# Altium PCB LED_Board.PcbDoc
Units mm, origin at the board's own origin, x right, y up, seen from the top; angles counter-clockwise.
Board outline 90 x 70 mm, 2 copper layers (Top Layer, Bottom Layer), stack 1.448 mm thick; 29 components, 16 nets, 91 pads, 36 vias.
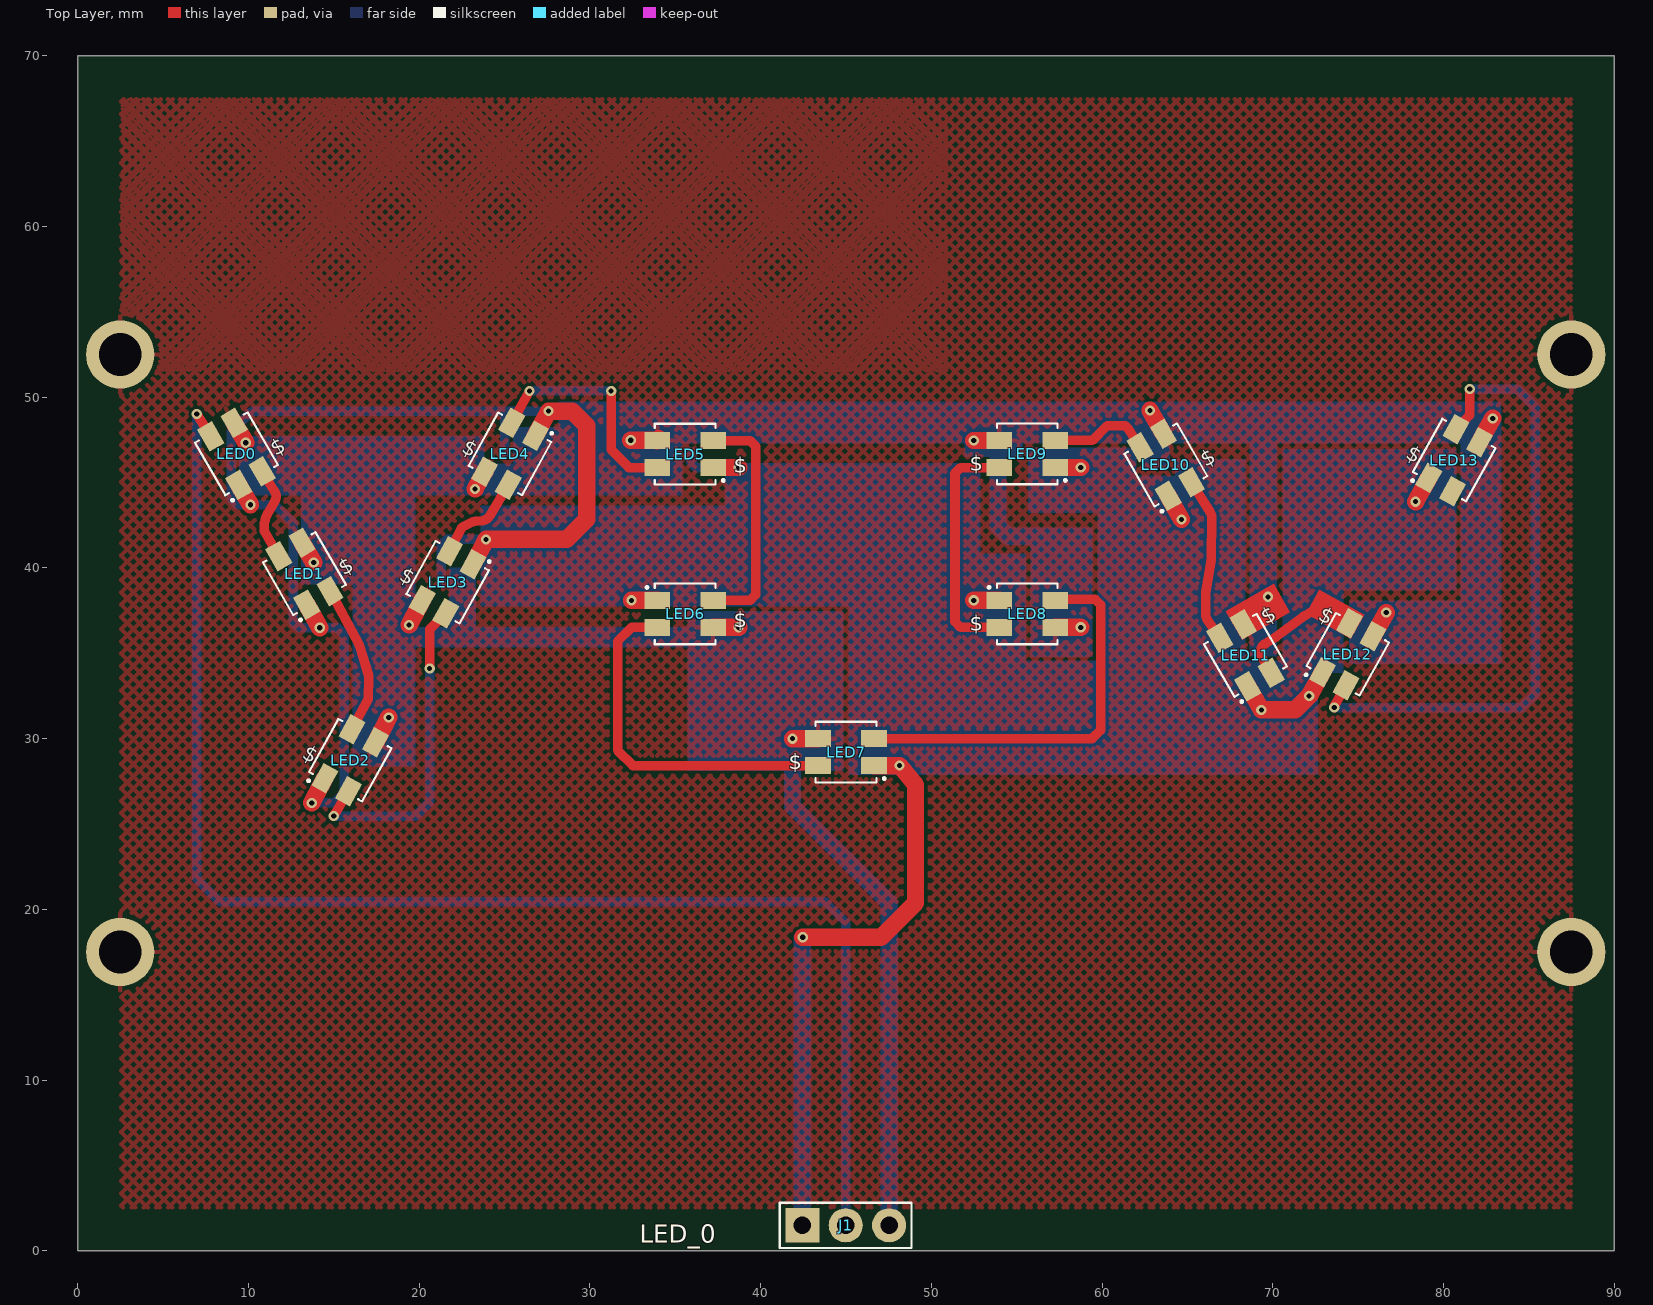
[diagram p0: Top Layer view]
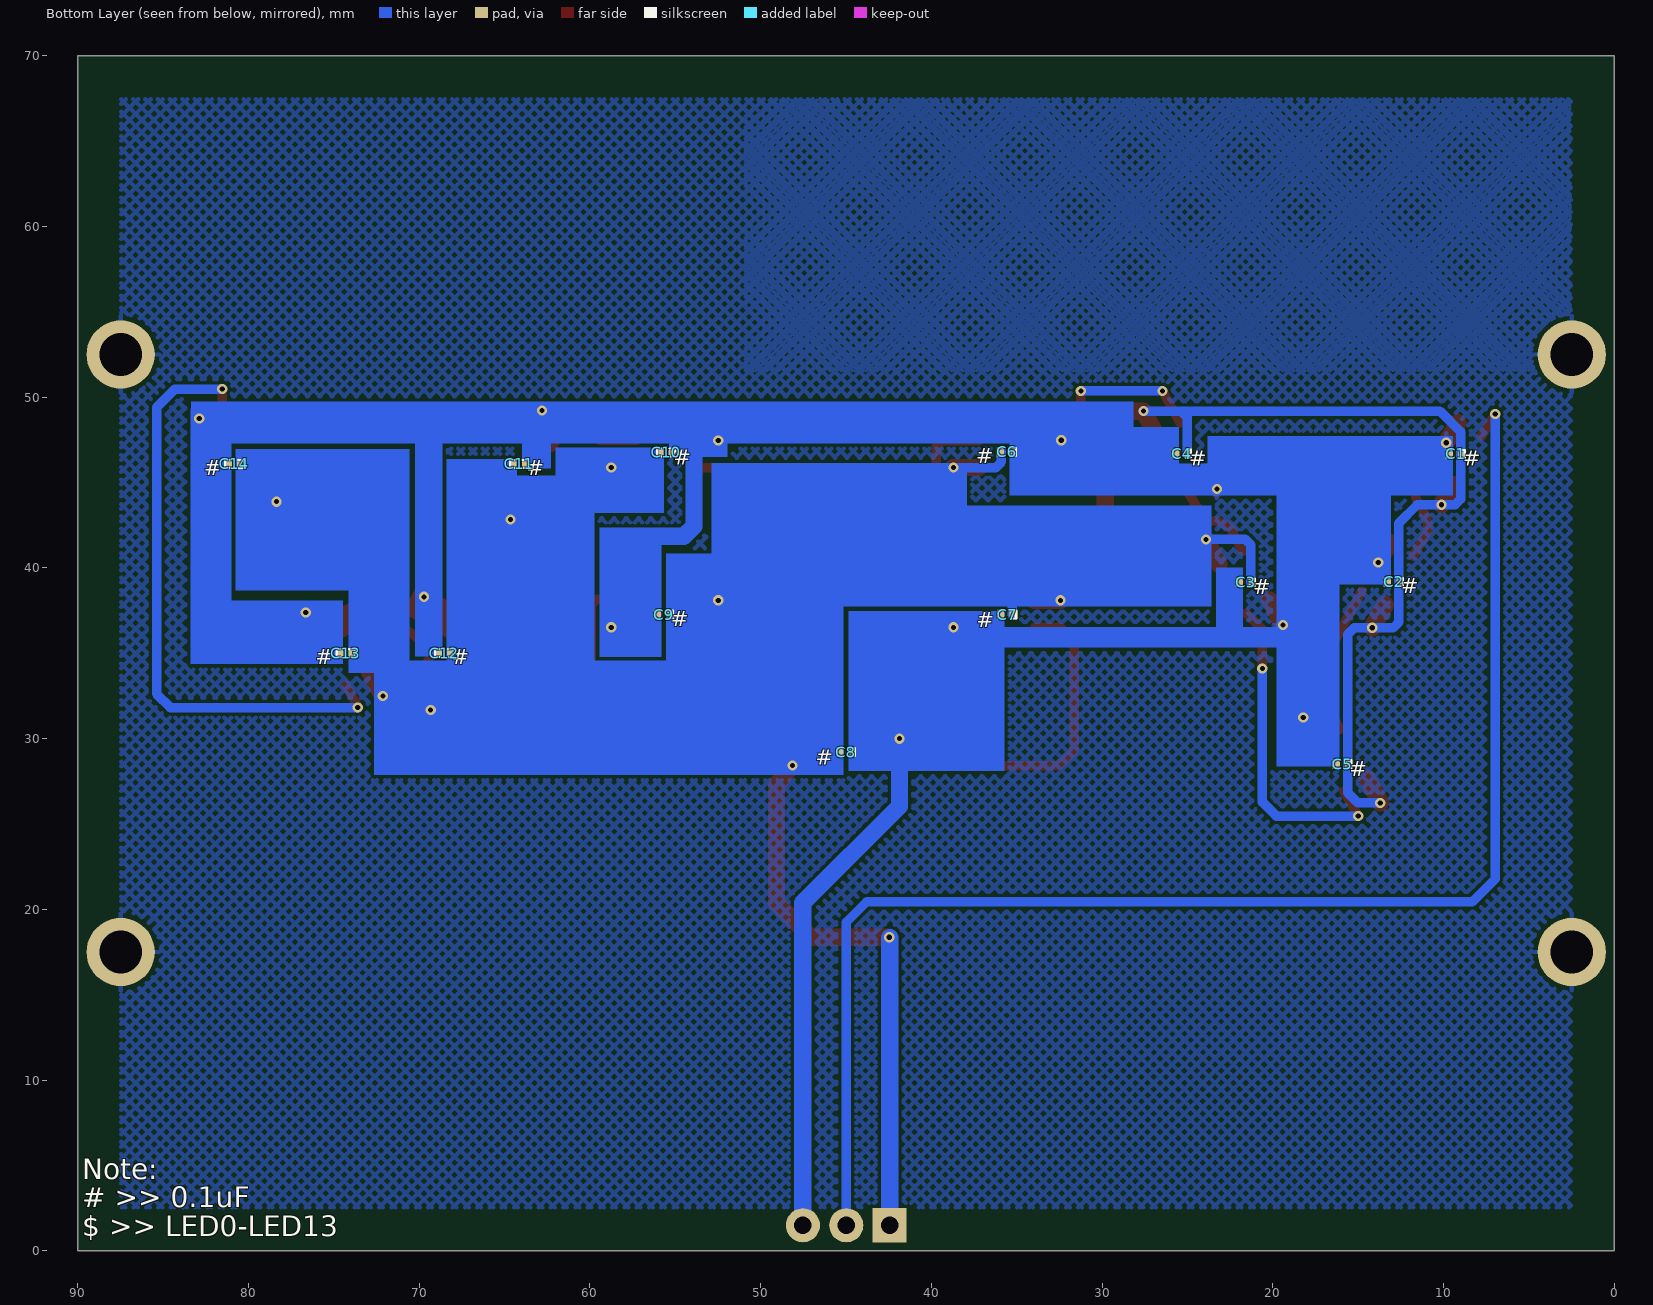
[diagram p1: Bottom Layer view, seen from below]
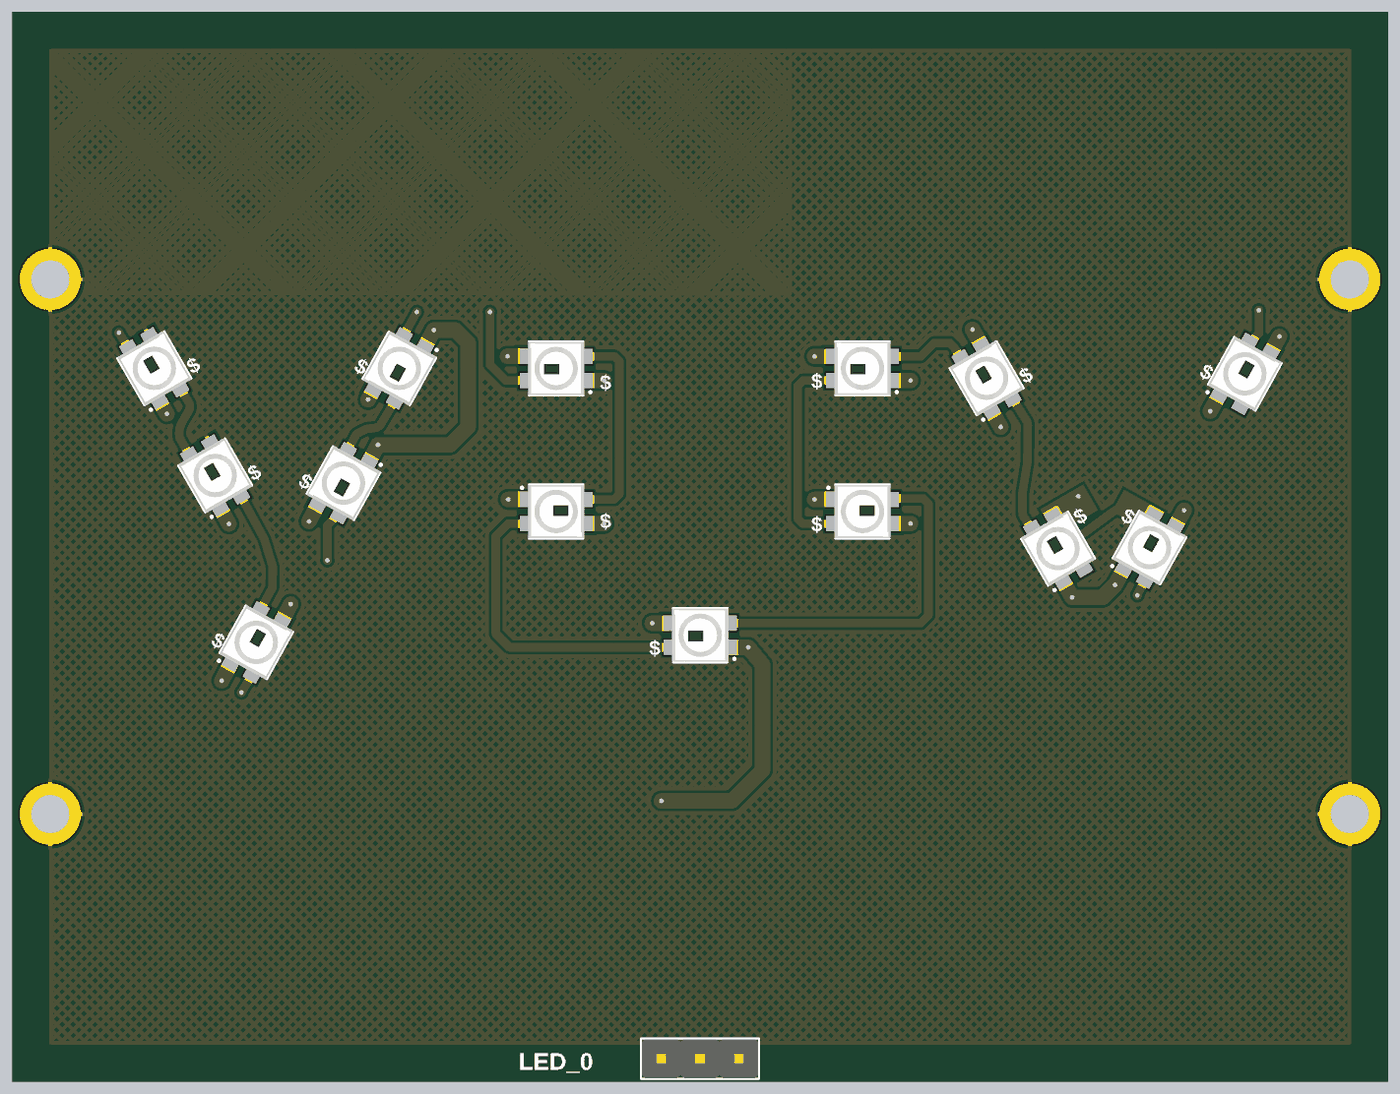
[diagram p2: 3D render of the assembled board from above, using the file's embedded part models]
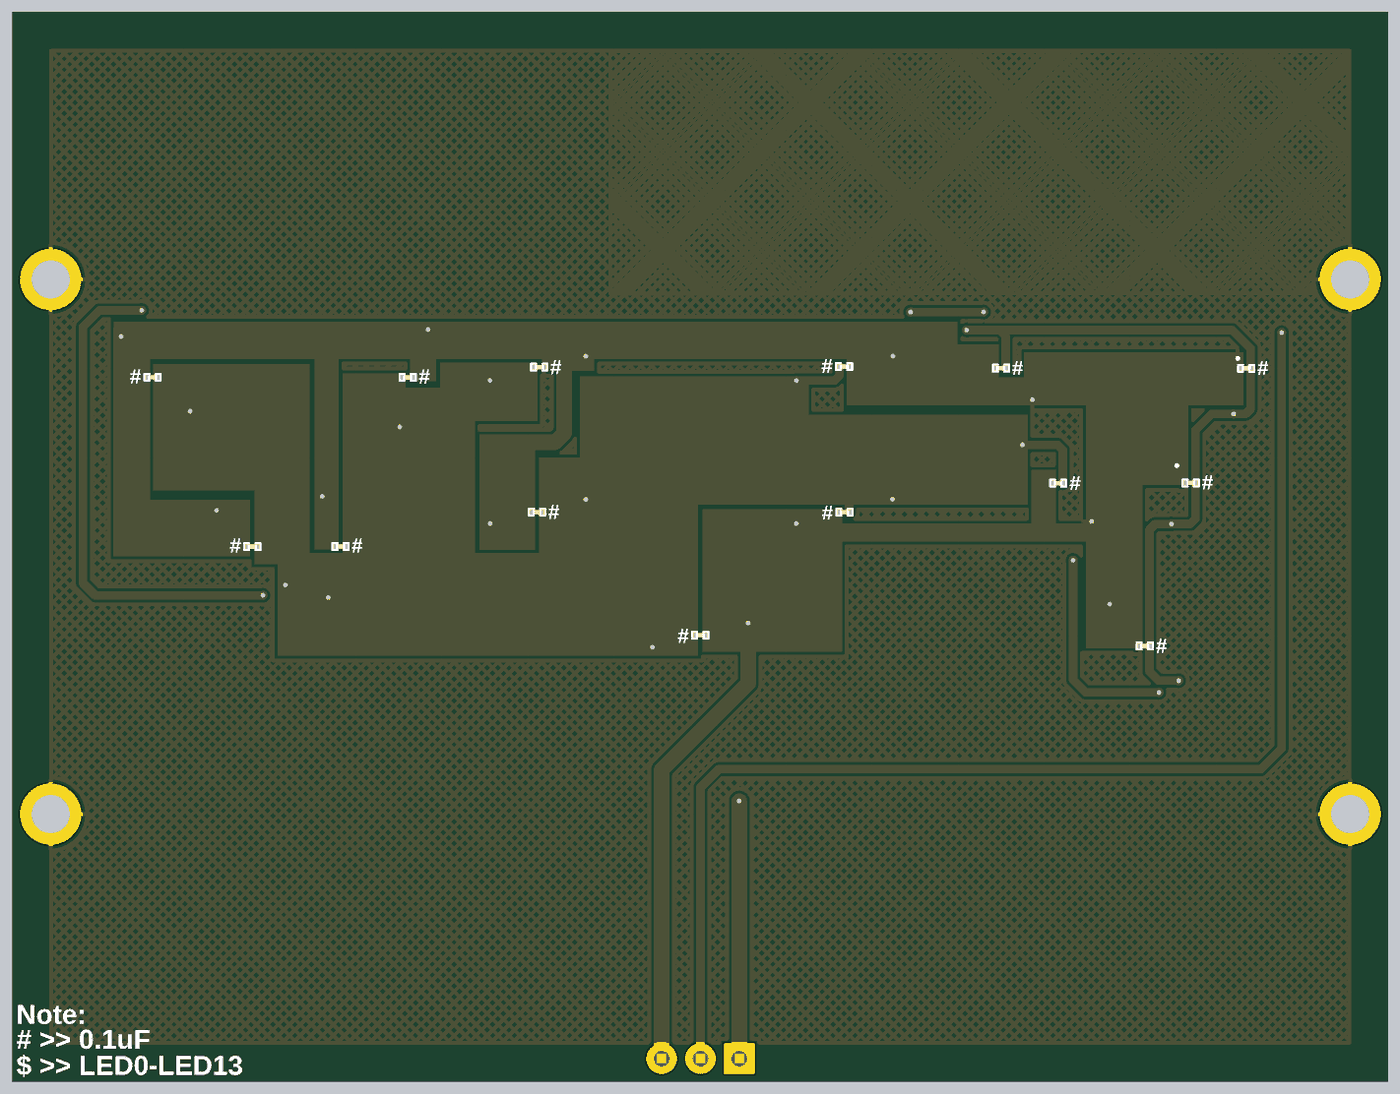
[diagram p3: 3D render of the assembled board from below, using the file's embedded part models]

## Layer stack, top to bottom
Top Solder: solder mask 0.0762, Solder Resist, Dk 3.5
Top Layer: signal copper 0.254
Dielectric 1: dielectric 0.9398, FR-4, Dk 4.8
Bottom Layer: signal copper 0.254
Bottom Solder: solder mask 0.0762, Solder Resist, Dk 3.5

## Board outline
0,0 90,0 90,70 0,70

## Design rules (kind name [scope] priority, off if disabled: settings)
Clearance [All] p1: gap=0.178 ignorepadtopadclearanceinfootprint=FALSE except(0: Arc-Hole Track-Hole SMDPad-Hole THPad-Hole Via-Hole Fill-Hole Poly-Hole Region-Hole Text-Hole; 0.076: Arc-SMDPad Track-SMDPad SMDPad-SMDPad)
HoleToHoleClearance [All] p1: gap=0 allowstackedmicrovias=TRUE
MinimumSolderMaskSliver [All] p1: minsoldermaskwidth=0
PolygonConnect [All] p1: connectstyle=Relief reliefconductorwidth=0.254 reliefentries=4 polygonreliefangle="90 Angle" airgapwidth=0.254
RoutingVias [All] p1: holewidth=0.3 width=0.6 viastyle="Through Hole" minholewidth=0.3 minwidth=0.6 maxholewidth=0.3 maxwidth=0.6
SilkToSilkClearance [All] p1: silktosilkclearance=0
SilkToSolderMaskClearance [IsPad] p1: minsilkscreentomaskgap=0 clearancetoexposedcopper=TRUE
SolderMaskExpansion [All] p1: expansion=0.102 istentingtop=FALSE
Width [All] p1: maxlimit=1.016 minlimit=0.254 preferedwidth=0.559
26 further rules are at their usual default settings.

## Components (designator, comment, footprint, x,y, rotation, side; value= is the part's Value field where it differs from the comment)
C1 "0.1uF" "CAP 0201" 9.294,46.68 r0 bottom
C2 "0.1uF" "CAP 0201" 12.914,39.175 r0 bottom
C3 "0.1uF" "CAP 0201" 21.584,39.16 r0 bottom
C4 "0.1uF" "CAP 0201" 25.324,46.695 r0 bottom
C5 "0.1uF" "CAP 0201" 15.924,28.505 r0 bottom
C6 "0.1uF" "CAP 0201" 35.594,46.795 r180 bottom
C7 "0.1uF" "CAP 0201" 35.564,37.265 r0 bottom
C8 "0.1uF" "CAP 0201" 45,29.209 r180 bottom
C9 "0.1uF" "CAP 0201" 55.674,37.265 r0 bottom
C10 "0.1uF" "CAP 0201" 55.534,46.76 r180 bottom
C11 "0.1uF" "CAP 0201" 64.135,46.09 r180 bottom
C12 "0.1uF" "CAP 0201" 68.524,35.015 r0 bottom
C13 "0.1uF" "CAP 0201" 74.294,35.005 r0 bottom
C14 "0.1uF" "CAP 0201" 80.824,46.09 r0 bottom
J1 "HDR_M_1X3" HDR_M_1X3 44.984,1.495 r0 top
LED0 "WS2812B-Mini" WS2812B-Mini 9.294,46.68 r120 top
LED1 "WS2812B-Mini" WS2812B-Mini 13.274,39.665 r120 top
LED2 "WS2812B-Mini" WS2812B-Mini 15.96,28.74 r61 top
LED3 "WS2812B-Mini" WS2812B-Mini 21.664,39.165 r241 top
LED4 "WS2812B-Mini" WS2812B-Mini 25.32,46.68 r241 top
LED5 "WS2812B-Mini" WS2812B-Mini 35.575,46.67 r180 top
LED6 "WS2812B-Mini" WS2812B-Mini 35.575,37.31 r0 top
LED7 "WS2812B-Mini" WS2812B-Mini 45,29.209 r180 top
LED8 "WS2812B-Mini" WS2812B-Mini 55.614,37.31 r0 top
LED9 "WS2812B-Mini" WS2812B-Mini 55.614,46.675 r180 top
LED10 "WS2812B-Mini" WS2812B-Mini 63.73,46.03 r120 top
LED11 "WS2812B-Mini" WS2812B-Mini 68.402,34.879 r120 top
LED12 "WS2812B-Mini" WS2812B-Mini 74.389,34.942 r61 top
LED13 "WS2812B-Mini" WS2812B-Mini 80.621,46.319 r61 top

## Footprints (in the part's own frame and the unit in brackets; to place one, negate y for a bottom-side part, rotate by r counter-clockwise, add the part's x,y. Pads: shape width x height; smd on the part's side, far side on the other; paste and mask are expansions set on the pad)
"CAP 0201" [mm]
  rect 0.3x0.3 smd mask+0.055: 1(-0.3,0) 2(0.3,0)
  silkscreen extent -0.53,-0.23 0.53,0.23, body extent -0.3,-0.15 0.3,0.15, height 0.28
HDR_M_1X3 [mm] "2.54mm spacer header"
  rect 2x2 hole 1.02: 1(-2.54,0)
  round 2 hole 1.02: 2(0,0) 3(2.54,0)
  silkscreen extent -3.86,-1.32 3.86,1.32, body extent -3.81,-1.27 3.81,1.27, height 11.93
WS2812B-Mini [mm] "SMD,3.5x3.5mm Light Emitting Diodes (LED) RoHS"
  rect 1.5x1 smd: 1(-1.64,0.79) 2(-1.64,-0.79) 3(1.64,-0.79) 4(1.64,0.79)
  silkscreen extent -2.31,-1.78 1.78,1.78, body extent -1.84,-1.74 1.84,1.74, height 1.95

## Part data
C1 C2 C3 C4 C5 C6 C7 C8 C9 C10 C11 C12 C13 C14: library part CC0201KRX5R6BB104, "Cap Ceramic 0.1uF 10V X5R 10% SMD 0201 85C Paper T/R", Capacitance=100nF, Case Code (Imperial)=0201, Case Code (Metric)=0603, Dielectric=X5R, Manufacturer=Yageo, Max Operating Temperature=85°C, Min Operating Temperature=-55°C, Resistor Type=Ceramic, Tolerance=10%, Voltage Rating=10V, Case/Package=0201, Category="Ceramic Capacitors", ComponentLink1Description=https://datasheet.ciiva.com/11587/upy-gphc-x5r-4v-to-50v-12-11587190.pdf?src-supplier=Avnet, ComponentLink1URL=https://datasheet.ciiva.com/11587/upy-gphc-x5r-4v-to-50v-12-11587190.pdf?src-supplier=Avnet, ComponentLink2Description=https://datasheet.ciiva.com/17437/upy-gphc-x5r-4v-to-50v-12-17437495.pdf?src-supplier=Avnet+Europe, ComponentLink2URL=https://datasheet.ciiva.com/17437/upy-gphc-x5r-4v-to-50v-12-17437495.pdf?src-supplier=Avnet+Europe, Construction=Flat, Depth=0.3mm, Halogen Free="Halogen Free", Height=0.3mm, Lead Free="Lead Free", Length=0.6mm, Manufacturer Part Number=CC0201KRX5R6BB104, Mount="Surface Mount", Packaging="Tape and Reel", Pricing 1="15000=0.00489, 30000=0.00489, 60000=0.00488, 90000=0.00488, 120000=0.00487, 150000=0.00486, 1500000=0.00485 (USD)", Radiation Hardening=No, RoHS=Yes, RoHS Compliant=Yes, Series=CC, Stock 1=2530000, Supplier 1=Avnet, Supplier Part Number 1=CC0201KRX5R6BB104, Termination=SMD/SMT, Thickness=0.013inch, Voltage Rating (DC)=10V, Weight=6E-06oz, Width=0.012inch
J1: "3 POS 2.54mm spacer header", Current Rating=1Amps, Manufacturer=E-SIMPO, ComponentLink1Description=AliE, ComponentLink1URL=https://www.aliexpress.com/item/32896225776.html?spm=a2g0o.productlist.0.0.64116a18Q9OFX2&algo_pvid=aef74b9f-f029-40ba-a87b-4c3df7d87b26&algo_exp_id=aef74b9f-f029-40ba-a87b-4c3df7d87b26-3&pdp_ext_f=%7B%22sku_id%22%3A%2265850500267%22%7D&pdp_pi=-1%3B2.79%3B-1%3BUSD+3.72%40salePrice%3BUSD%3Bsearch-mainSearch, Pitch=2.54mm
LED0 LED1 LED2 LED3 LED4 LED5 LED6 LED7 LED8 LED9 LED10 LED11 LED12 LED13: "SMD,3.5x3.5mm Light Emitting Diodes (LED) RoHS", Manufacturer=Worldsemi, Package=SMD,3.5x3.5mm, ComponentLink1Description=LCSC, ComponentLink1URL=*https://lcsc.com/product-detail/Light-Emitting-Diodes-LED_Worldsemi-WS2812B-Mini_C527089.html

## Free pads (board coordinates)
  round 4 hole 2.5: MH1(2.489,52.499) MH2(2.489,17.501) MH3(87.485,17.501) MH4(87.485,52.499)

## Via types
v1: diameter 0.6, hole 0.3, Top Layer to Bottom Layer, tented both sides, 36 vias

## Nets (pads, with @x,y where several pads share a name; then routed paths per layer and width w, separated by ;. In a path a pad name is that pad's centre, name@x,y a point inside that pad or via, vN(x,y) a via of type N, cw(c..) or ccw(c..) an arc to the next point about the centre after c; other vN are vias at no path point)
GND: C1.2 C2.2 C3.2 C4.2 C5.2 C6.2 C7.2 C8.2 C9.2 C10.2 C11.2 C12.2 C13.2 C14.2 J1.3 LED0.3 LED1.3 LED2.3 LED3.3 LED4.3 LED5.3 LED6.3 LED7.3 LED8.3 LED9.3 LED10.3 LED11.3 LED12.3 LED13.3 pad.MH1 pad.MH2 pad.MH3 pad.MH4 | length 64.5
  Top Layer w1.016: LED0.3 v1(9.844,47.33) ; LED1.3 v1(13.824,40.315) ; LED2.3 v1(18.216,31.245) ; v1(19.409,36.66) LED3.3 ; v1(23.274,44.625) LED4.3 ; v1(32.394,47.475) 34.07,47.475 34.1,47.505 34.04,47.565 LED5.3@33.93,47.455 ; LED6.3 v1(38.71,36.52) ; v1(41.865,29.999) LED7.3 ; v1(52.479,47.465) LED9.3 ; LED8.3 v1(58.75,36.52) ; v1(62.806,49.225) LED10.3 ; LED12.3 v1(76.647,37.382) ; LED13.3 v1(82.88,48.758)
  Bottom Layer w0.254: C1.2 C1.2@9.607,46.692 ; v1@9.844,47.236 v1(9.844,47.33) ; v1(52.479,47.465) v1@52.519,47.505 ; v1@82.874,48.765 v1(82.88,48.758)
  Bottom Layer w1.016: 41.865,35.444 v1(41.865,29.999) 41.865,26.044 47.524,20.385 J1.3@47.524,1.435 ; 53.856,46.852 53.905,46.803 53.905,42.44 54.5,41.845 57.324,41.845
  other v1: 69.724,38.305
LED_0: J1.2 LED0.4 | length 85.6
  Top Layer w0.559: v1(6.974,49.015) LED0.4
  Bottom Layer w0.559: v1(6.974,49.015) 6.974,21.785 8.314,20.445 43.784,20.445 44.984,19.245 J1.2@44.984,1.435
LED_1: LED0.2 LED1.4 | length 5.6
  Top Layer w0.559: LED0.2 11.535,44.48 ; 11.535,44.48 cw(c11.062,44.183) 11.545,43.903 11.114,43.159 11.113,43.158 ccw(c12.367,42.435) 10.926,42.303 10.94,42.146 LED1.4
LED_2: LED1.2 LED2.4 | length 8.9
  Top Layer w0.559: LED1.2@14.815,38.585 LED1.2 16.458,35.554 cw(c15.967,35.287) 16.501,35.451 17.018,33.771 cw(c16.484,33.607) 17.042,33.594 17.014,32.315 LED2.4
LED_3: LED2.2 LED3.4 | length 19.1
  Top Layer w0.559: v1(14.994,25.465) LED2.2 ; v1(20.614,34.115) 20.614,36.402 LED3.4
  Bottom Layer w0.559: v1(14.994,25.465) 19.794,25.465 20.614,26.285 v1(20.614,34.115)
LED_4: LED3.2 LED4.4 | length 5.5
  Top Layer w0.559: LED3.2 22.429,42.233 cw(c22.923,41.972) 22.68,42.475 23.088,42.673 cw(c23.332,42.17) 23.271,42.726 23.709,42.774 ; 23.71,42.774 ccw(c23.647,43.33) 24.127,43.043 LED4.4
LED_5: LED4.2 LED5.4 | length 13.7
  Top Layer w0.559: LED4.2@25.424,48.714 LED4.2 v1(26.464,50.365) ; v1(31.243,50.365) 31.243,46.926 32.289,45.88 LED5.4
  Bottom Layer w0.559: v1(26.464,50.365) v1(31.243,50.365)
LED_6: LED5.2 LED6.4 | length 14
  Top Layer w0.559: LED6.4 39.377,38.1 39.704,38.427 39.704,47.132 39.377,47.46 LED5.2
LED_7: LED6.2 LED7.4 | length 21.1
  Top Layer w0.559: LED6.2 32.44,36.52 31.624,35.704 31.624,29.315 32.52,28.419 LED7.4
LED_8: LED7.2 LED8.4 | length 23.6
  Top Layer w0.559: LED7.2 59.419,29.999 59.924,30.505 59.924,37.827 59.597,38.155 57.309,38.155 LED8.4
LED_9: LED8.2 LED9.4 | length 14.2
  Top Layer w0.559: LED8.2 51.712,36.52 51.384,36.847 51.384,45.552 51.712,45.88 LED9.4@53.974,45.88
LED_10: LED9.2 LED10.4 | length 6
  Top Layer w0.559: LED9.2 59.434,47.465 60.304,48.335 61.342,48.335 61.55,48.127 61.669,47.938 LED10.4
LED_11: LED10.2 LED11.4 | length 9.7
  Top Layer w0.559: LED10.2 66.337,43.254 cw(c65.864,42.956) 66.422,42.949 66.395,40.547 cw(c65.836,40.553) 66.387,40.462 66.082,38.579 ccw(c66.633,38.49) 66.074,38.49 66.074,37.252 ccw(c66.633,37.252) 66.176,36.93 LED11.4
LED_12: LED11.2 LED12.4 | length 6.1
  Top Layer w0.559: LED11.2 69.345,34.773 cw(c69.822,35.065) 69.524,35.537 70.137,35.924 ccw(c69.839,36.397) 70.171,35.947 71.843,37.176 cw(c72.174,36.726) 71.867,37.193 72.934,37.895
LED_13: LED12.2 LED13.4 | length 37.4
  Top Layer w0.559: v1(73.597,31.818) 73.597,31.843 73.574,31.865 LED12.2 ; LED13.4 81.534,48.945 v1(81.534,50.475)
  Bottom Layer w0.559: v1(73.597,31.818) 84.568,31.818 85.374,32.625 85.374,49.405 84.304,50.475 v1(81.534,50.475)
VCC_5V: C1.1 C2.1 C3.1 C4.1 C5.1 C6.1 C7.1 C8.1 C9.1 C10.1 C11.1 C12.1 C13.1 C14.1 J1.1 LED0.1 LED1.1 LED2.1 LED3.1 LED4.1 LED5.1 LED6.1 LED7.1 LED8.1 LED9.1 LED10.1 LED11.1 LED12.1 LED13.1 | length 135
  Top Layer w1.016: LED0.1 v1(10.116,43.699) ; LED1.1 v1(14.174,36.495) ; v1(13.704,26.235) LED2.1 ; LED3.1 v1(23.92,41.67) 28.64,41.67 29.824,42.855 29.824,48.335 28.974,49.185 v1(27.575,49.185) LED4.1 ; v1(32.439,38.1) LED6.1 ; LED5.1 v1(38.71,45.88) ; v1(42.464,18.365) 47.054,18.365 49.074,20.385 49.074,27.285 v1(48.135,28.419) LED7.1 ; v1(52.479,38.1) LED8.1 ; LED9.1 v1(58.75,45.885) ; LED10.1 v1(64.654,42.835) ; LED11.1 v1(69.326,31.684) 71.311,31.684 v1(72.13,32.502) LED12.1 ; v1(78.363,43.879) LED13.1
  Bottom Layer w0.559: v1(13.704,26.235) 15.014,26.235 15.624,26.845 C5.1 15.624,36.105 15.242,36.487 14.182,36.487 v1(14.174,36.495) 12.942,36.495 12.614,36.822 C2.1 12.614,42.625 11.54,43.699 v1(10.116,43.699) 9.322,43.699 8.994,44.027 C1.1 8.994,47.964 10.215,49.185 25.375,49.185 ; C3.1 21.284,41.343 21.612,41.67 v1(23.92,41.67) ; C4.1 25.024,48.835 25.375,49.185 ; v1(27.575,49.185) 27.568,49.193 27.56,49.185 25.375,49.185 ; v1(32.439,38.1) 34.819,38.1 ; 35.254,38.315 C7.1 ; C6.1 35.894,46.207 36.222,45.88 v1(38.71,45.88) ; 38.71,42.509 39.176,42.043 ; v1(52.479,38.1) v1@52.49,38.1 ; v1(78.363,43.879) v1@78.365,43.881
  Bottom Layer w1.016: J1.1@42.444,1.435 v1@42.444,18.345
pads on no net: LED13.2

## Polygon pours and split planes (outlines as drawn)
GND on Bottom Layer "Polygon_2" (hatched 45Degree grid 0.508 track 0.254, pour order 4): 2.54,67.46 87.46,67.46 87.46,2.54 2.54,2.54
GND on Bottom Layer "Polygon_2" (hatched 45Degree grid 0.457 track 0.203, remove dead copper, pour order 1): 2.598,67.423 50.915,67.402 50.894,51.546 2.577,51.567
GND on Top Layer "Polygon_1" (hatched 45Degree grid 0.508 track 0.254, pour order 3): 2.54,67.46 87.46,67.46 87.46,2.54 2.54,2.54
GND on Top Layer "Polygon_2" (hatched 45Degree grid 0.457 track 0.203, remove dead copper, pour order 2): 2.598,67.423 50.915,67.402 50.894,51.546 2.577,51.567

## Other copper
Top Layer:
  region net GND: 71.018,37.395 70.047,39.078 67.236,37.455 68.208,35.772
  region net LED_12: 74.574,35.845 75.365,37.27 72.72,38.736 71.93,37.311
Bottom Layer:
  rectangle net VCC_5V: 70.554,33.855 74.154,38.925
  region net VCC_5V: 80.773,46.961 70.554,46.961 70.554,38.675 80.773,38.675
  rectangle net VCC_5V: 53.544,27.865 72.654,34.585
  rectangle net VCC_5V: 55.654,43.215 62.014,47.055
  rectangle net GND: 55.794,34.795 59.444,42.355
  rectangle net GND: 18.824,35.325 42.364,36.525
  rectangle net GND: 21.746,36.265 23.336,40.031
  rectangle net GND: 74.454,34.358 83.394,38.085
  rectangle net GND: 68.644,34.825 70.234,48.215
  rectangle net GND: 80.983,34.825 83.394,49.335
  rectangle net VCC_5V: 64.264,44.915 68.394,46.365
  rectangle net VCC_5V: 59.744,30.995 68.394,45.425
  rectangle net GND: 28.174,47.295 83.374,49.735
  rectangle net GND: 62.274,45.835 63.974,49.735
  rectangle net VCC_5V: 45.134,27.865 55.554,40.845
  rectangle net VCC_5V: 37.904,42.205 52.874,46.155
  rectangle net GND: 51.934,46.505 55.354,48.265
  rectangle net GND: 34.904,47.335 53.044,48.265
  rectangle net GND: 22.674,44.245 26.534,46.105
  rectangle net GND: 25.484,44.245 35.424,48.265
  rectangle net VCC_5V: 23.584,37.745 52.874,43.645
  rectangle net GND: 9.454,44.245 23.814,47.735
  rectangle net GND: 13.074,39.025 16.774,47.735
  rectangle net GND: 16.084,28.355 19.784,45.235
  rectangle net GND: 35.723,28.115 44.864,37.463

## Silkscreen, mask and mechanical layers (free items; w line width, h text height)
Top Overlay:
  text "$" at 22.294,46.575 h1.52 r331
  text "$" at 11.754,46.285 h1.52 r30
  text "$" at 77.584,46.215 h1.52 r331
  text "$" at 66.204,45.645 h1.52 r30
  text "$" at 52.254,45.385 h1.52
  text "$" at 38.434,45.295 h1.52
  text "$" at 15.741,39.275 h1.52 r30
  text "$" at 18.639,39.06 h1.52 r331
  text "$" at 72.444,36.765 h1.52 r331
  text "$" at 69.759,36.417 h1.52 r30
  text "$" at 38.434,36.225 h1.52
  text "$" at 52.254,36.015 h1.52
  text "$" at 12.935,28.635 h1.52 r331
  text "$" at 41.654,27.915 h1.52
  text "LED_0" at 32.915,0.127 h1.78
Bottom Overlay:
  text "#" at 36.335,47.289 h1.52 r180
  text "#" at 54.065,47.209 h1.52 r180
  text "#" at 7.825,47.169 h1.52 r180
  text "#" at 23.865,47.159 h1.52 r180
  text "#" at 62.675,46.595 h1.52 r180
  text "#" at 81.564,46.595 h1.52 r180
  text "#" at 11.445,39.679 h1.52 r180
  text "#" at 20.115,39.629 h1.52 r180
  text "#" at 54.205,37.749 h1.52 r180
  text "#" at 36.305,37.689 h1.52 r180
  text "#" at 67.065,35.539 h1.52 r180
  text "#" at 75.025,35.539 h1.52 r180
  text "#" at 45.735,29.629 h1.52 r180
  text "#" at 14.455,28.969 h1.52 r180
  text "Note:" at 89.735,3.774 h2.03
  text "# >> 0.1uF" at 89.732,2.145 h2.03
  text "$ >> LED0-LED13" at 89.732,0.434 h2.03
Mechanical 1:
  lines w0.013: 36.076,29.241 36.889,29.261 ; 77.235,47.415 77.305,47.401 77.347,47.363 77.359,47.308 77.338,47.241
  lines w0.254: 0,35.004 0,26.134 25.375,26.134 35.314,26.175 35.574,26.175 ; 0,46.68 0,35 ; 0.02,46.68 9.294,46.68 ; 9.294,44.245 9.294,49.075 ; 9.294,46.675 25.324,46.68 ; 12.984,36.655 12.984,41.835 ; 21.584,36.415 21.584,41.655 ; 25.32,26.189 25.32,70 45,70 ; 25.324,44.245 25.324,49.075 ; 35.564,46.675 55.534,46.675 ; 35.575,26.175 35.575,26.255 35.575,70 45,70 ; 35.6,29.209 90,29.209 90,34.989 ; 44.96,39.16 0,39.16 0,35 ; 45,0 45,70 ; 55.534,46.465 55.534,47.056 ; 64.135,46.09 90.016,46.09 ; 64.14,46.729 64.14,70 45,70 ; 80.824,43.285 80.824,48.735 ; 90,46.09 90,35 0,35
Mechanical 2:
  the board outline again, w0.254

## Dimensions
64.135,46.09 to 80.824,48.735 on Mechanical 1
0,35 to 0.02,46.68 on Mechanical 1
35.564,46.675 to 55.534,46.675 on Mechanical 1
64.14,70 to 45,70 on Mechanical 1
0,39.16 to 0,35 on Mechanical 1
90,35 to 90,29.209 on Mechanical 1
90.016,46.09 to 90,35 on Mechanical 1
25.32,70 to 45,70 on Mechanical 1
87.485,52.499 to 2.489,52.499 on Mechanical 1
87.485,17.501 to 87.485,52.499 on Mechanical 1
2.489,17.501 to 2.489,52.499 on Mechanical 1
90,70 to 90,0 on Mechanical 1
0,70 to 90,70 on Mechanical 1